# Altium PCB DSP大板子.PcbDoc (part 8 of 9)
Units mil, origin at the board's own origin, x right, y up, seen from the top; angles counter-clockwise.
Board outline 7874.02 x 9055.12 mil, 4 copper layers (Top Layer, GND02, PWR03, Bottom Layer), stack 23.756 mil thick; 656 components, 360 nets, 1967 pads, 2623 vias.
Unrouted connection lines stored in the file: 70.
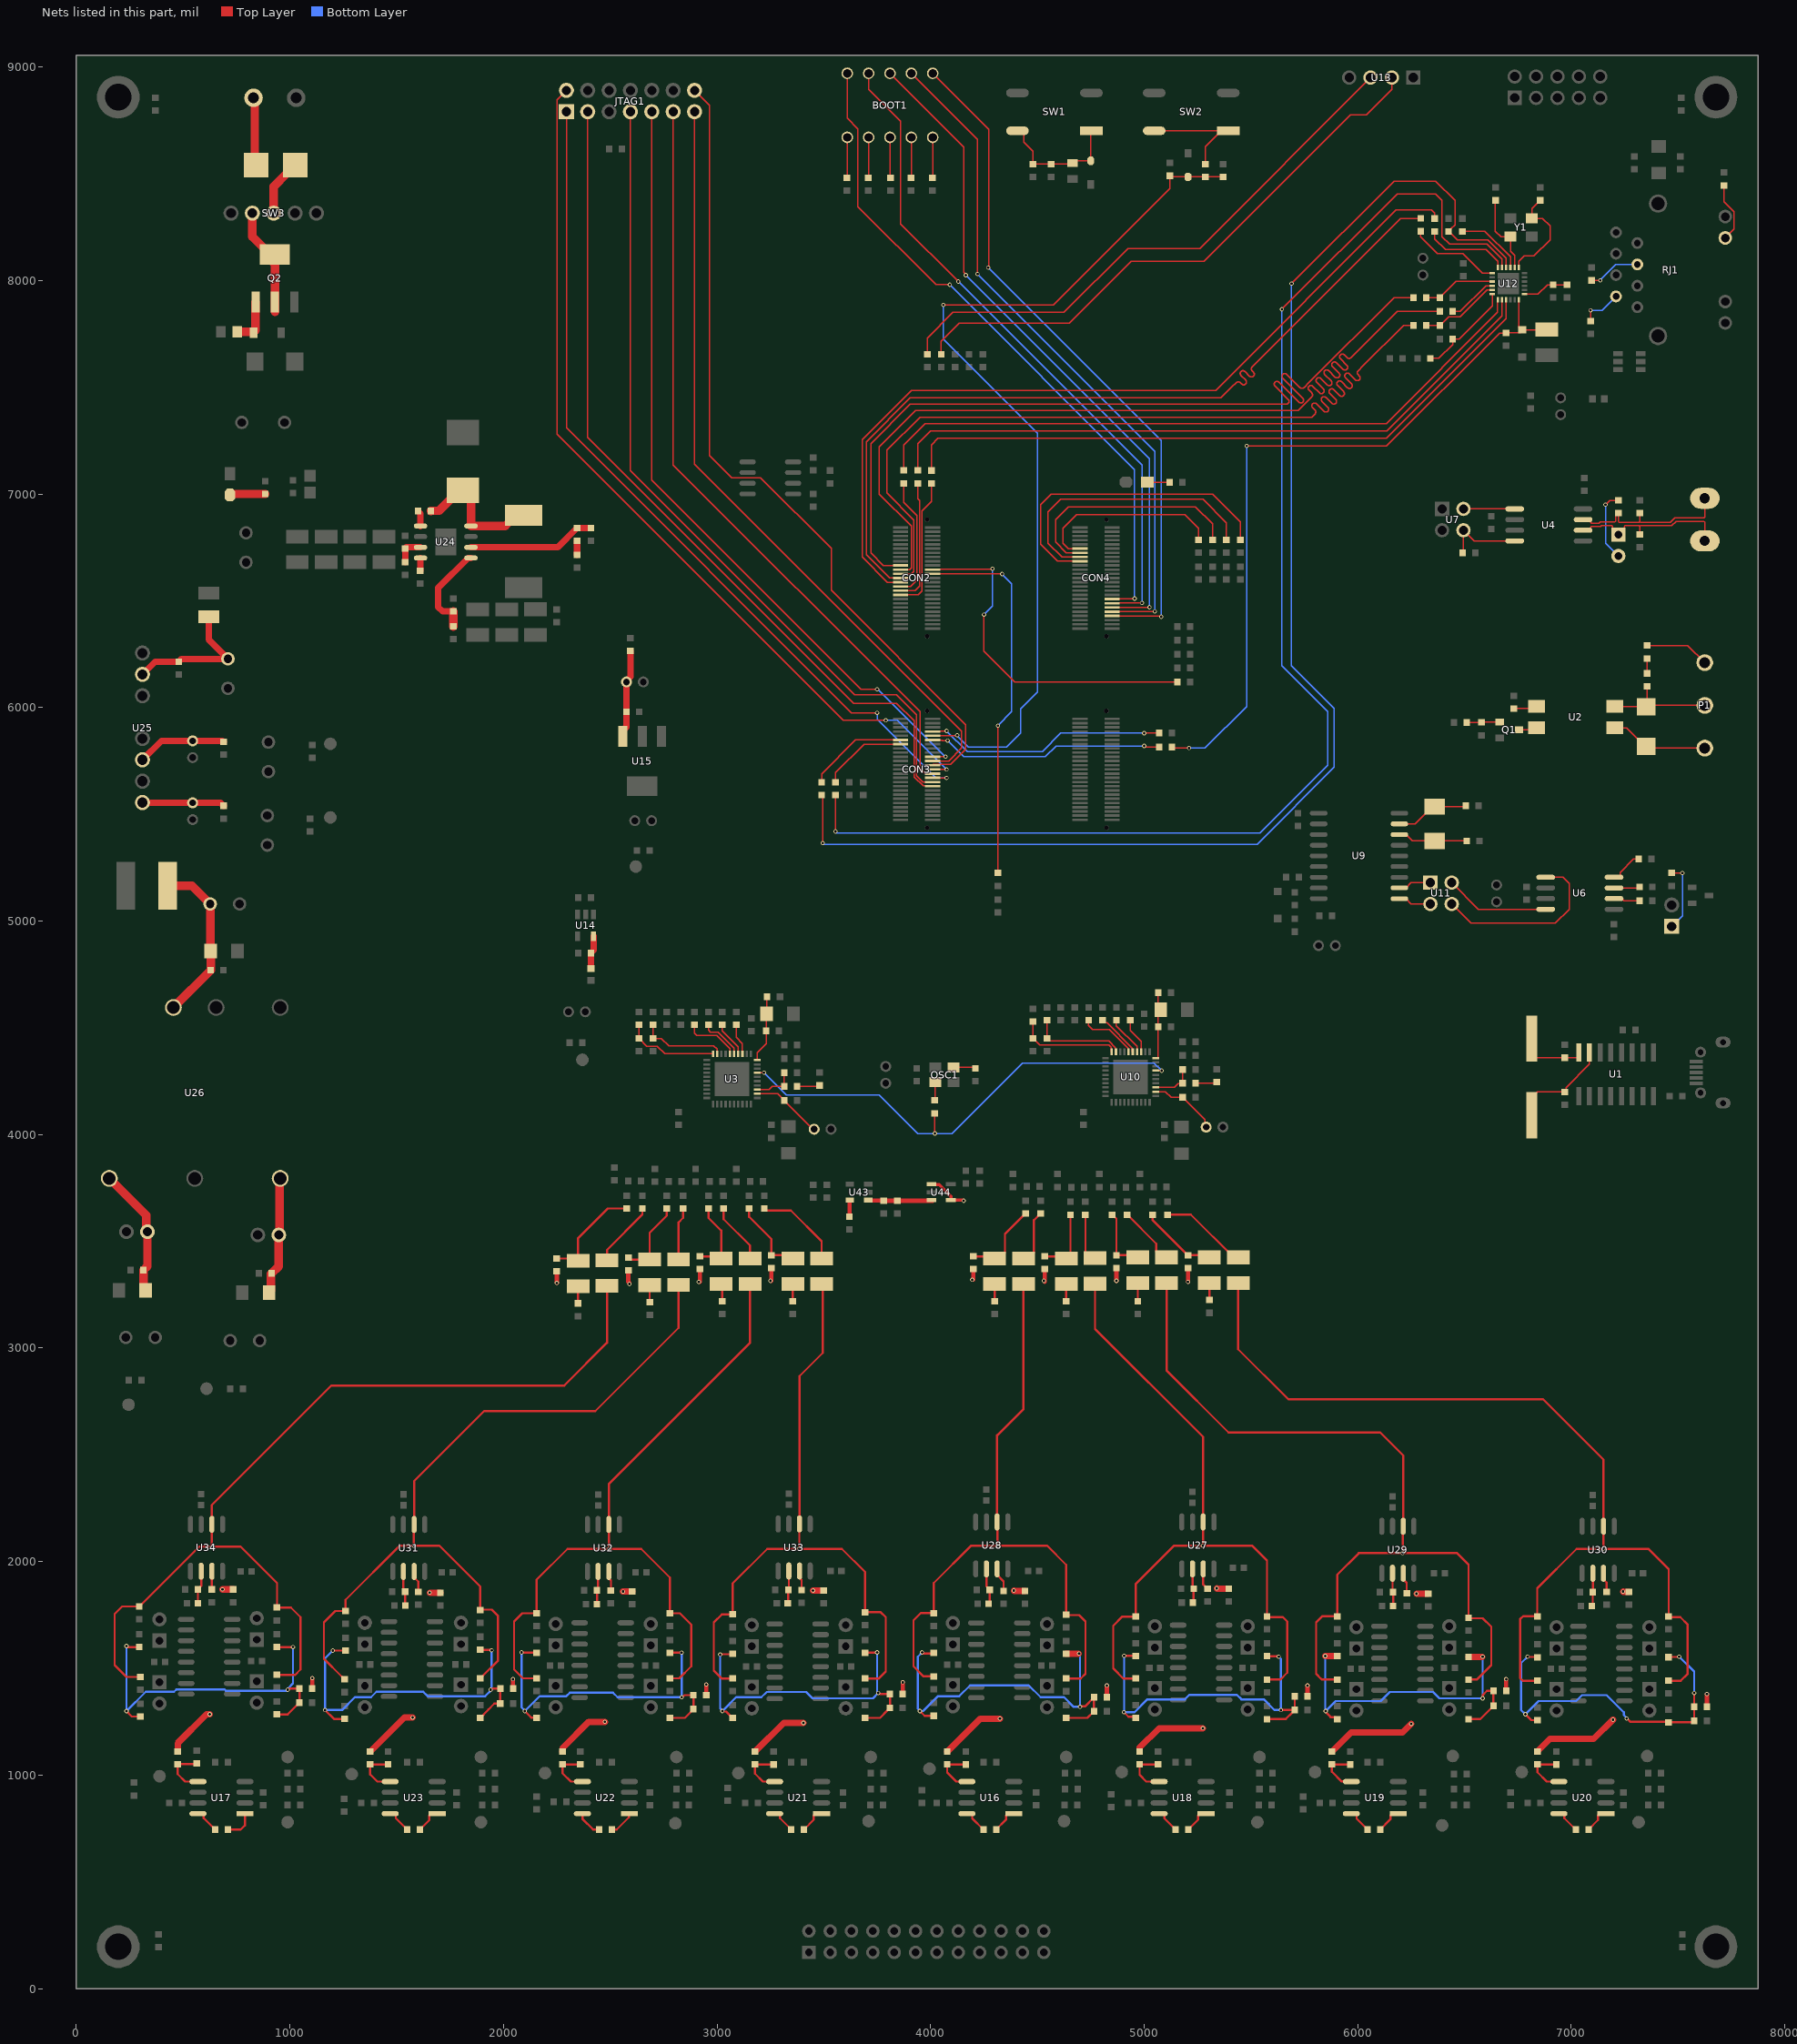
[diagram p7: the nets of this part, all layers, seen from the top]

## Via types
v1: diameter 20, hole 12, Top Layer to Bottom Layer, tented both sides, 2623 vias

## Nets (pads, with @x,y where several pads share a name; then routed paths per layer and width w, separated by ;. In a path a pad name is that pad's centre, name@x,y a point inside that pad or via, vN(x,y) a via of type N, cw(c..) or ccw(c..) an arc to the next point about the centre after c; other vN are vias at no path point) (continued)
J15: CON3.23 JTAG1.11 | length 3622.6
  Top Layer w6: JTAG1.11@2795,8790 2795,7135 3950,5980 3950,5715.66 3972.16,5693.5 4006.54,5693.5 CON3.23@4009.44,5690.6
J16: CON3.29 JTAG1.13 | length 3658.3
  Top Layer w6: JTAG1.13@2895,8790 2895,7140 4145,5890 4145,5810 4084.7,5749.7 CON3.29@4009.44,5749.7
J18: CON3.19 JTAG1.7 | length 3865.6
  Top Layer w6: JTAG1.7@2595,8790 2595,7110 3645,6060 3840,6060 3935,5965 3935,5680 3963.8,5651.2 CON3.19@4009.44,5651.2
K16: CON3.27 JTAG1.14 | length 3876.8
  Top Layer w6: JTAG1.14@2895,8890 2965,8820 2965,7180 3069.31,7075.69 3204.31,7075.69 3535,6745 3535,6550 4165,5920 4165,5805 4092.9,5732.9 4012.34,5732.9 CON3.27@4009.44,5730
K17: CON3.31 JTAG1.9 | length 3697.2
  Top Layer w6: JTAG1.9@2695,8790 2695,7065 3675,6085 v1(3750,6085) ; CON3.31@4009.44,5769.4 4009.74,5769.7 4069.7,5769.7 v1(4070,5770)
  Bottom Layer w6: v1(3750,6085) 3752.5,6085 4067.5,5770 v1(4070,5770)
L16: CON3.21 JTAG1.1 | length 4022.8
  Top Layer w6: JTAG1.1@2295,8790 2295,7310 3630,5975 v1(3750,5975) ; CON3.21@4009.44,5670.9 4009.89,5670.45 4074.55,5670.45 v1(4075,5670)
  Bottom Layer w6: v1(3750,5975) 3750,5945 4025,5670 v1(4075,5670)
L17: CON3.25 JTAG1.2 | length 4169.2
  Top Layer w6: JTAG1.2@2295,8890 2250.57,8845.57 2250.57,7279.43 3590,5940 v1(3790,5940) ; CON3.25@4009.44,5710.3 4009.59,5710.15 4074.85,5710.15 v1(4075,5710)
  Bottom Layer w6: v1(3790,5940) 3845,5940 v1(4075,5710)
M16: CON3.17 JTAG1.3 | length 3969.7
  Top Layer w6: JTAG1.3@2395,8790 2395,7265 3640,6020 3840.42,6020 3923,5937.42 3923,5675.03 3964.99,5633.04 4008.01,5633.04 CON3.17@4009.44,5631.6
MCLK: R27.2 U3.7 U10.7 | length 2285.4
  Top Layer w6: U3.7@3188.1,4289.6 3219.6,4289.6 v1(3220,4290) ; v1(4020,4005) R27.2@4020,4100 ; U10.7@5055.05,4299.6 v1(5082,4299.6)
  Bottom Layer w6: v1(3220,4290) 3325,4185 3760,4185 3940,4005 v1(4020,4005) 4100,4005 4430,4335 5046.6,4335 v1(5082,4299.6)
MDCLK/MDC: R80.1 U12.11 | length 6353.1
  Top Layer w6: v1(3555,5420) R80.1@3555,5590.08 ; v1(5645,7865) 6185,8405 6365,8405 6395,8375 6395,8205 6430,8170 6605,8170 6675,8100 U12.11@6675,8060
  Bottom Layer w6: v1(3555,5420) 3562.15,5412.85 5542.85,5412.85 5860,5730 5860,5980 5645,6195 v1(5645,7865)
MDIO: R84.1 R92.1 U12.10 | length 6645.6
  Top Layer w6: R84.1@3490,5590.08 3495,5585.08 v1(3495,5365) ; v1(5690,7985) 6170,8465 6365,8465 6455,8375 6455,8260 6437.75,8242.75 6437.75,8241.96 R92.1@6425.79,8230 ; R92.1@6425,8230 R92.1@6425.79,8230 ; U12.10@6695,8060 6695,8105 6610,8190 6465.79,8190 R92.1@6425.79,8230
  Bottom Layer w6: v1(3495,5365) 3500,5360 5530,5360 5890,5720 5890,5995 5690,6195 v1@5690,7984.49
NetBOOT1_1: BOOT1.1 R9.1 | length 191.2
  Top Layer w6: R9.1@3607.47,8479.84 3610,8482.37 BOOT1.1@3610,8670
NetBOOT1_2: BOOT1.2 R11.1 | length 191
  Top Layer w6: R11.1@3708.03,8479.84 3710,8481.81 BOOT1.2@3710,8670
NetBOOT1_3: BOOT1.3 R14.1 | length 191
  Top Layer w6: BOOT1.3@3810,8670 3810,8481.84 R14.1@3812,8479.84
NetBOOT1_4: BOOT1.4 R16.1 | length 191
  Top Layer w6: R16.1@3907.9,8479.84 3910,8481.95 BOOT1.4@3910,8670
NetBOOT1_5: BOOT1.5 R17.1 | length 190.5
  Top Layer w6: R17.1@4009.08,8479.84 4010,8480.76 BOOT1.5@4010,8670
NetC1_2: C1.2 R1.1 R5.1 SW1.1 SW1.4 Z1.2 | length 613.7
  Top Layer w6: SW1.4@4406.77,8701 4421.82,8701 4437.24,8685.59 4437.24,8647.31 4480,8604.54 R1.1@4480,8544.92 R5.1@4565,8544.92 4659.92,8544.92 C1.2@4665,8550 4675.12,8560.12 Z1.2@4750,8560.12 4750,8697.77 SW1.1@4753.23,8701
NetC3_1: C3.1 R8.1 R282.2 | length 493.5
  Top Layer w10: R282.2@2250,3420 2250.16,3419.84 2339.86,3419.84 C3.1@2350,3409.7 2350,3515 2488.9,3653.9 R8.1@2576.42,3653.9
NetC3_2: C3.2 R120.2 | length 80.2
  Top Layer w10: R120.2@2350,3209.84 C3.2@2350,3290
NetC6_2: C6.2 R13.1 | length 311.3
  Top Layer w10: C6.2@2485.31,3411.15 2485.31,3460.31 2650.88,3625.88 R13.1@2650.88,3653.9
NetC12_1: C12.1 R25.1 R283.2 | length 381.2
  Top Layer w10: R283.2@2585,3430 2585,3425.63 2595.93,3414.7 C12.1@2685,3414.7 2685,3540 2765,3620 R25.1@2765,3653.9
NetC12_2: C12.2 R123.2 | length 77.2
  Top Layer w10: R123.2@2685,3214.84 2685,3285 C12.2@2690,3290
NetC13_2: C13.2 U1.8 X1.2 | length 315.6
  Top Layer w6: X1.2@6815,4449.25 6815,4382.59 6837.59,4360 C13.2@6970,4360 7026.19,4360 7035,4368.81 U1.8@7035,4384.72
NetC14_2: C14.2 U1.7 X1.1 | length 481.1
  Top Layer w6: X1.1@6815,4090.75 6815,4173.43 6841.5,4199.92 C14.2@6970,4199.92 6975.37,4205.29 6975.37,4220.37 7085,4330 U1.7@7085,4384.72
NetC15_1: C15.1 R29.1 | length 247.9
  Top Layer w10: C15.1@2820,3415 2820,3588.26 2841.67,3609.93 R29.1@2841.67,3653.9
NetC20_1: C20.1 R39.1 R284.2 | length 363.3
  Top Layer w10: R284.2@2919.84,3429.92 3010.08,3429.92 C20.1@3020,3420 ; R39.1@2960,3653.9 2960,3610 3019.84,3550.16 C20.1@3019.84,3419.7
NetC20_2: C20.2 R133.2 | length 72.1
  Top Layer w10: C20.2@3020,3290 3024.84,3285.16 R133.2@3024.84,3219.92
NetC25_1: C25.1 R43.1 | length 285.5
  Top Layer w10: R43.1@3031.15,3653.9 3031.15,3603.85 3155.1,3479.9 C25.1@3155.1,3419.7
NetC28_1: C28.1 C29.1 U3.2 | length 335.6
  Top Layer w6: U3.2@3188.1,4191.1 3284.84,4191.1 C28.1@3315,4160.94 ; C28.1@3315.16,4160 3315.16,4159.21 3449.37,4025 C29.1@3455,4025
NetC30_2: C30.2 C32.2 R53.2 U3.10 | length 315.9
  Top Layer w6: U3.10@3188.1,4348.6 3188.1,4384.31 3230.08,4426.29 C30.2@3230.08,4485 3230.08,4562.78 C32.2@3232.3,4565 3232.3,4642.14 R53.2@3235.16,4645
NetC31_1: C31.1 C34.1 U3.3 | length 201.3
  Top Layer w6: U3.3@3185,4210 3185.8,4210.8 3243.63,4210.8 3257.83,4225 C31.1@3315.08,4225 ; C31.1@3315,4225 3315,4289.92 C34.1@3315.08,4290
NetC31_2: C31.2 R50.1 | length 107.1
  Top Layer w6: C31.2@3375,4225 3474.92,4225 R50.1@3480,4230.08
NetC33_1: C33.1 R48.1 R285.2 | length 378.8
  Top Layer w10: R48.1@3149.86,3653.9 3149.86,3615.14 3255,3510 R285.2@3255,3434.84 3350.16,3434.84 C33.1@3365,3420
NetC33_2: C33.2 R134.2 | length 87.1
  Top Layer w10: C33.2@3350,3305 3355,3300 R134.2@3355,3219.92
NetC36_1: C36.1 U9.8 X2.2 | length 345.2
  Top Layer w6: U9.8@6195,5455 6268.74,5455 6350.16,5536.42 X2.2@6360,5536.42 6501.42,5536.42 C36.1@6505,5540
NetC37_1: C37.1 R52.1 | length 412.3
  Top Layer w10: R52.1@3220,3650 3226.06,3643.94 3346.06,3643.94 3489.61,3500.39 C37.1@3489.61,3419.7
NetC40_1: C40.1 U9.7 X2.1 | length 327.5
  Top Layer w6: U9.7@6195,5405 6225.32,5405 6255.32,5375 X2.1@6360,5375 C40.1@6510.08,5375
NetC41_1: C41.1 R57.1 R286.2 | length 379.6
  Top Layer w10: R286.2@4200,3429.84 4280.16,3429.84 C41.1@4290,3420 ; C41.1@4300,3419.7 4320.95,3419.7 4348.15,3446.9 4348.15,3534.02 4440,3625.87 R57.1@4440,3635
NetC41_2: C41.2 R135.2 | length 79.3
  Top Layer w10: R135.2@4300,3219.84 4300,3285 C41.2@4310,3295
NetC44_1: C44.1 R60.1 | length 263.3
  Top Layer w10: C44.1@4435,3419.7 4455.95,3419.7 4483.15,3446.9 4483.15,3599.02 4519.13,3635 R60.1@4520,3635
NetC47_1: C47.1 R67.1 R287.2 | length 315.6
  Top Layer w10: R287.2@4535,3429.84 4630.16,3429.84 C47.1@4635,3425 ; C47.1@4635,3419.7 4655,3439.7 R67.1@4655,3625
NetC47_2: C47.2 R139.2 | length 70.1
  Top Layer w10: R139.2@4635,3219.92 C47.2@4635,3290
NetC48_1: C48.1 R69.1 | length 232.9
  Top Layer w10: R69.1@4725,3625 4725,3448.33 4752.2,3421.13 C48.1@4770,3421.13
NetC53_1: C53.1 R74.1 R288.2 | length 294
  Top Layer w10: R74.1@4850,3625 4850.87,3625 4870,3605.87 R288.2@4870,3434.84 4964.84,3434.84 C53.1@4965,3435
NetC53_2: C53.2 R140.2 | length 87.3
  Top Layer w10: R140.2@4965,3220 4970,3225 C53.2@4970,3305.2
NetC57_2: C57.2 C58.2 U12.1 | length 218.6
  Top Layer w6: U12.1@6780,7935 6780.79,7935.79 6844.48,7935.79 6888.53,7979.84 C57.2@6915,7979.84 6979.92,7979.84 C58.2@6980,7979.92
NetC59_1: C59.1 R77.1 | length 294.2
  Top Layer w10: R77.1@4920,3630 4920,3625.87 5056.85,3489.02 5056.85,3451.9 5084.05,3424.7 C59.1@5105,3424.7
NetC61_2: C61.2 C65.2 R89.2 U10.10 | length 319
  Top Layer w6: U10.10@5055.05,4358.6 5062.58,4358.6 5065.08,4361.1 C61.2@5065.08,4505 5065.08,4580.08 5070,4585 5065.08,4589.92 R89.2@5065.08,4665
NetC62_1: C62.1 C63.1 U10.2 | length 323.9
  Top Layer w6: U10.2@5055,4200 5056.1,4201.1 5100,4201.1 5126.1,4175 C62.1@5180,4175 ; C62.1@5180.08,4175 5180.08,4174.21 5284.7,4069.59 5284.7,4045.3 C63.1@5295,4035
NetC64_1: C64.1 C66.1 U10.3 | length 197.3
  Top Layer w6: U10.3@5055.8,4220.8 5140.8,4220.8 5159.63,4239.63 5179.71,4239.63 C64.1@5180.08,4240 5180.08,4304.92 C66.1@5180,4305
NetC64_2: C64.2 R87.1 | length 102.1
  Top Layer w6: C64.2@5239.92,4240 5335,4240 R87.1@5340,4245
NetC67_1: C67.1 R91.1 R289.2 | length 363
  Top Layer w10: R91.1@5040,3625 5040,3599.13 5204.21,3434.92 R289.2@5205,3434.92 ; R289.2@5205.08,3434.92 5294.78,3434.92 C67.1@5305,3424.7
NetC67_2: C67.2 R141.2 | length 85.2
  Top Layer w10: R141.2@5305,3220 C67.2@5305,3305.2
NetC70_1: C70.1 R95.1 | length 413
  Top Layer w10: R95.1@5110,3625 5110.08,3625.08 5218.67,3625.08 5419.05,3424.7 C70.1@5440,3424.7
NetC74_1: C74.1 RJ1.5 | length 246.7
  Top Layer w6: C74.1@7095,8000.08 7095.08,8000 v1(7135,8000)
  Bottom Layer w6: v1(7135,8000) 7135,8002.61 7207.39,8075 RJ1.5@7309.09,8075
NetC75_1: C75.1 RJ1.2 | length 196
  Top Layer w6: C75.1@7090,7810 v1(7090,7860)
  Bottom Layer w6: v1(7090,7860) 7144.09,7860 RJ1.2@7209.09,7925
NetC79_2: C79.2 L2.1 U14.5 | length 155.8
  Top Layer w30: C79.2@2409.92,4850 2409.96,4849.96 L2.1@2410,4777.6 L2.1@2410,4777.6 ; C79.2@2409.92,4850.71 2422.4,4863.19 U14.5@2422.4,4928.9
NetC84_1: C84.1 C85.1 R126.2 U15.3 | length 414.2
  Top Layer w30: U15.3@2559.45,5865 2559.45,5892.56 2575.16,5908.27 C85.1@2575.16,5980 ; C85.1@2575.16,5980.71 2576.26,5981.81 C84.1@2576.26,6120 2576.26,6125.73 2595,6144.47 R126.2@2595,6265.16
NetC86_1: C86.1 U24.1 | length 74.9
  Top Layer w30: C86.1@1600.16,6920 1600.16,6919.29 1611.89,6907.56 U24.1@1611.89,6850
NetC86_2: C86.2 D6.1 L3.1 U24.8 | length 640.4
  Top Layer w40: C86.2@1660,6920 1661.51,6921.51 1698.81,6921.51 1795.02,7017.73 1808.46,7017.73 1848.11,6978.08 U24.8@1848.11,6850 2008.31,6850 2057.6,6899.29 L3.1@2095,6899.29
NetC108_2: C108.2 R128.2 U24.6 | length 599.2
  Top Layer w30: U24.6@1848.11,6750 2254.37,6750 2344.29,6839.92 R128.2@2345,6839.92 2409.21,6839.92 2409.29,6839.84 C108.2@2410,6839.84
NetC112_2: C112.2 C118.1 L5.1 U26.6 | length 556.7
  Top Layer w40: L5.1@902.7,3260 911.93,3269.23 911.93,3347.01 C118.1@914.92,3350 948.42,3383.5 C112.2@948.43,3530 ; C112.2@948.43,3530 951.71,3533.29 951.71,3791.71 U26.6@955,3795
NetC117_2: C117.2 R128.1 | length 65.2
  Top Layer w30: C117.2@2345,6714.84 R128.1@2345,6780.08
NetC123_1: C123.1 C155.2 L7.1 U26.4 | length 610.8
  Top Layer w40: U26.4@155,3795 327.89,3622.11 327.89,3550.53 C123.1@333.43,3545 ; L7.1@325,3270 315.77,3279.23 315.77,3364.02 314.84,3364.94 C155.2@314.84,3365 333.42,3383.58 C123.1@333.43,3545
NetC138_1: C138.1 C139.1 L4.2 U25.2 | length 663.8
  Top Layer w30: U25.2@310,6155 369.92,6214.92 C139.1@480,6214.92 ; C139.1@480.71,6214.92 493.59,6227.8 C138.1@710,6227.8 620,6317.8 L4.2@620,6424.88
NetC140_1: C140.1 R195.2 U25.6 | length 418.3
  Top Layer w30: U25.6@310,5755 398.74,5843.74 C140.1@545,5843.74 685.47,5843.74 689.29,5839.92 R195.2@690,5839.92
NetC141_2: C141.2 R200.2 U25.8 | length 386.2
  Top Layer w30: U25.8@310,5555 310.63,5554.37 544.37,5554.37 C141.2@545,5553.74 675.55,5553.74 689.29,5540 R200.2@690,5540
NetC146_1: C146.1 R233.1 U27.2 | length 161.7
  Top Layer w10: U27.2@5226.48,1966.09 5226.48,1878.17 R233.1@5231.42,1873.23 5231.42,1812.63 C146.1@5227.02,1808.23
NetC147_1: C147.1 R234.1 U28.2 | length 171.2
  Top Layer w10: U28.2@4261.62,1966.09 4261.62,1884.26 4276.87,1869.02 R234.1@4276.87,1868.23 4276.87,1808.23 C147.1@4271.87,1803.23
NetC148_1: C148.1 R240.1 U29.2 | length 153.8
  Top Layer w10: U29.2@6162.82,1945.62 6162.82,1859.32 R240.1@6164.22,1857.93 6165.5,1856.65 C148.1@6165.5,1792.93
NetC149_1: C149.1 R241.1 U30.2 | length 154.7
  Top Layer w10: C149.1@7095.61,1793.01 7099.93,1797.33 R241.1@7099.93,1858.01 7100.61,1858.69 U30.2@7100.61,1945.62
NetC150_1: C150.1 R243.1 U31.2 | length 162.7
  Top Layer w10: U31.2@1531.93,1954.07 1531.93,1867.99 R243.1@1539.92,1860 1539.92,1795.68 C150.1@1540.6,1795
NetC151_1: C151.1 R244.1 U32.2 | length 155.6
  Top Layer w10: C151.1@2438.49,1800.54 R244.1@2438.49,1865.54 2443.44,1870.49 U32.2@2443.44,1954.07
NetC152_1: C152.1 R245.1 U33.2 | length 153.6
  Top Layer w10: C152.1@3331.2,1805 3333.41,1807.21 R245.1@3333.41,1868.23 3336.39,1871.21 U33.2@3336.39,1956.41
NetC153_1: C153.1 R247.1 U34.2 | length 155.7
  Top Layer w10: R247.1@569.92,1870.08 569.92,1805.76 C153.1@570.6,1805.08 ; R247.1@569.92,1870.87 585,1885.94 U34.2@585,1955.08
NetC156_1: C156.1 C157.1 C172.2 L6.2 U26.3 | length 792.7
  Top Layer w40: L6.2@428.43,5165 542.2,5165 C156.1@627.2,5080 628.4,5078.8 628.4,4861.2 C172.2@629.6,4860 629.6,4770.48 C157.1@630.08,4770 630,4770 U26.3@455,4595
NetC175_1: C175.1 U43.5 | length 78.5
  Top Layer w20: C175.1@3620,3614.84 3620.85,3615.69 3620.85,3691.76 U43.5@3621.69,3692.6
NetCON2_27: CON2.27 R113.1 | length 1771.7
  Top Layer w6: CON2.27@4009.44,6626.06 4009.97,6625.53 4334.47,6625.53 v1(4335,6625) ; R113.1@4315,5224.84 v1(4315,5915)
  Bottom Layer w6: v1(4315,5915) 4380,5980 4380,6580 v1(4335,6625)
NetCON2_29: CON2.29 R115.1 | length 1649
  Top Layer w6: CON2.29@4009.44,6645.76 4011.56,6647.88 4287.88,6647.88 v1(4290,6650) ; v1(4250,6435) 4250,6265 4395,6120 R115.1@5155.08,6120
  Bottom Layer w6: v1(4250,6435) 4290,6475 v1(4290,6650)
NetCON3_38: CON3.38 R80.2 | length 405.2
  Top Layer w6: R80.2@3555,5649.92 3555,5695 3688.4,5828.4 CON3.38@3859.84,5828.4
NetCON3_40: CON3.40 R84.2 | length 475.4
  Top Layer w6: R84.2@3490,5649.92 3490,5690 3648.1,5848.1 CON3.40@3859.84,5848.1
NetCON5_1: CON5.1 J1.1 R34.1 U4.6 | length 769.5
  Top Layer w6: U4.6@7055,6830 7082.13,6830 7090.44,6838.31 7090.44,6842.72 7094.73,6847 7136.51,6847 7141.74,6852.23 7189.3,6852.23 7192.82,6848.72 7192.82,6837.18 J1.1@7220,6810 7247.41,6837.41 7247.41,6848.49 7250.93,6852 7277.94,6852 7277.98,6852.04 7316.41,6852.04 7319.92,6848.52 7319.92,6810.08 R34.1@7320,6810 ; 7320,6848.52 7323.51,6852.04 7470.52,6852.04 7490.48,6872 7621.49,6872 7625,6868.49 CON5.1@7625,6780
NetCON5_2: CON5.2 R42.2 R55.1 U4.7 | length 794
  Top Layer w6: U4.7@7055,6880 7082.13,6880 7090.44,6871.69 7090.44,6867.28 7094.73,6863 7129.88,6863 7135.11,6868.23 7203.74,6868.23 7207.25,6871.75 7207.25,6898.04 7219.21,6910 R42.2@7220,6910 7220,6871.51 7223.51,6868 7271.31,6868 7271.35,6868.04 7316.41,6868.04 7319.92,6871.55 7319.92,6910 R55.1@7320,6910.08 ; 7320,6871.55 7323.51,6868.04 7463.89,6868.04 7483.85,6888 7621.49,6888 7625,6891.51 CON5.2@7625,6980
NetD7_2: D7.2 Q2.1 R274.2 | length 225.9
  Top Layer w40: R274.2@753.04,7760 827.56,7760 D7.2@830.63,7756.93 ; D7.2@830.63,7755 D7.2@830.63,7756.93 ; Q2.1@839.45,7898.39 839.45,7765.75 D7.2@830.63,7756.93
NetF1_1: F1.1 P2.2 | length 319.8
  Top Layer w40: P2.2@830,8855 835.77,8849.23 835.77,8545.77 F1.1@841.54,8540
NetF1_2: F1.2 SW3.2 | length 266.5
  Top Layer w40: SW3.2@925,8315 925,8440 987.72,8502.72 987.72,8502.81 1024.91,8540 F1.2@1025,8540
NetJ1_2: J1.2 R42.1 | length 333.1
  Top Layer w6: v1(7160,6950) 7179.84,6969.84 R42.1@7220,6969.84
  Bottom Layer w6: v1(7160,6950) 7160,6770 J1.2@7220,6710
NetLED1_1: LED1.1 R32.2 | length 105
  Top Layer w6: LED1.1@5015,7055 R32.2@5120,7055
NetLED2_2: LED2.2 R273.2 | length 167.1
  Top Layer w40: LED2.2@720,6995 725,7000 R273.2@885,7000
NetOSC1_1: OSC1.1 R18.1 | length 103.6
  Top Layer w6: OSC1.1@4108.3,4314.5 4205.42,4314.5 R18.1@4210,4309.92
NetOSC1_3: OSC1.3 R27.1 | length 86.5
  Top Layer w6: R27.1@4020,4159.84 4021.7,4161.54 OSC1.3@4021.7,4245.6
NetQ1_1: Q1.1 R7.2 R12.2 | length 155.8
  Top Layer w6: R7.2@6510,5930 6579.84,5930 R12.2@6580,5929.84 6582.56,5932.4 Q1.1@6664.73,5932.4
NetQ1_3: Q1.3 U2.2 | length 85.8
  Top Layer w6: Q1.3@6755.27,5895 6826.93,5895 U2.2@6836.93,5905
NetQ2_2: Q2.2 Q2.4 SW3.3 | length 512.4
  Top Layer w40: SW3.3@825,8315 825,8204.37 907.76,8121.61 Q2.4@930,8121.61 ; Q2.4@902.23,8104.38 930,8076.61 Q2.2@930,7898.39 Q2.2@930,7853.39
NetR2_2: R2.2 R4.1 | length 70.2
  Top Layer w6: R4.1@7355,6159.84 R2.2@7355,6230
NetR3_2: R3.2 U2.1 | length 111.1
  Top Layer w6: R3.2@6730,5995 6826.93,5995 U2.1@6836.93,6005
NetR15_1: R15.1 SW2.1 SW2.4 | length 566.8
  Top Layer w6: SW2.4@5047.06,8701 SW2.1@5393.51,8701 5360.05,8701 5285.77,8626.72 R15.1@5285.77,8544.92
NetR19_2: R19.2 R36.1 U3.20 | length 440.6
  Top Layer w6: R36.1@2635,4449.84 R19.2@2635,4515.16 ; R36.1@2635.79,4449.84 2671.59,4414.04 2719.48,4414.04 2755.32,4378.2 U3.20@2981.4,4378.2
NetR20_2: R20.2 R37.2 U3.19 | length 408.1
  Top Layer w6: R20.2@2700,4515.08 R37.2@2700,4449.92 2740.08,4449.92 2775,4415 2985,4415 3000.56,4399.44 3000.56,4378.74 U3.19@3001.1,4378.2
NetR24_1: R24.1 U3.16 | length 259.7
  Top Layer w6: R24.1@2895,4515 2895,4475 2905,4465 2998.05,4465 3060.1,4402.95 U3.16@3060.1,4378.2
NetR26_1: R26.1 U3.15 | length 206.9
  Top Layer w6: R26.1@2960,4515 2960,4490 2970,4480 3005,4480 3079.8,4405.2 U3.15@3079.8,4378.2
NetR28_1: R28.1 U3.14 | length 167.7
  Top Layer w6: R28.1@3025,4515 3025,4485 3099.5,4410.5 U3.14@3099.5,4378.2
NetR31_1: R31.1 U3.13 | length 148.9
  Top Layer w6: R31.1@3090,4515 3090,4455 3119.2,4425.8 U3.13@3119.2,4378.2
NetR44_1: R44.1 U6.8 | length 158.8
  Top Layer w6: U6.8@7200,5205 7220.69,5205 7229,5213.31 7229,5227.88 7291.12,5290 R44.1@7315.08,5290
NetR45_2: R45.2 U6.7 | length 122.2
  Top Layer w6: U6.7@7200,5155 7315.16,5155 R45.2@7320.16,5160
NetR49_1: R49.1 U8.1 | length 320.3
  Top Layer w6: R49.1@7470,5224.84 v1(7519.84,5224.84)
  Bottom Layer w6: U8.1@7470,4975 7519.84,5024.84 v1(7519.84,5224.84)
NetR54_2: R54.2 U6.6 | length 124.2
  Top Layer w6: U6.6@7200,5105 7236.87,5105 7246.87,5095 R54.2@7320.08,5095
NetR58_2: R58.2 R70.1 U10.20 | length 484.1
  Top Layer w6: R70.1@4480,4449.84 R58.2@4480,4530 ; R70.1@4480.79,4449.84 4510.63,4420 4835,4420 4846.59,4408.41 4846.59,4389.96 U10.20@4848.35,4388.2
NetR59_2: R59.2 R71.2 U10.19 | length 436
  Top Layer w6: R71.2@4545,4450 4557.04,4437.96 4834.01,4437.96 4865.55,4406.42 4865.55,4390.7 U10.19@4868.05,4388.2 ; R71.2@4545,4461.88 R59.2@4545,4540
NetR63_1: R63.1 U10.16 | length 270.3
  Top Layer w6: R63.1@4740,4535.08 4740,4511.12 4759.06,4492.06 4837.57,4492.06 4924.55,4405.08 4924.55,4390.7 U10.16@4927.05,4388.2
NetR64_1: R64.1 U10.15 | length 208.9
  Top Layer w6: R64.1@4805,4530 4811.88,4523.12 4826.11,4523.12 4944.25,4404.98 4944.25,4390.7 U10.15@4946.75,4388.2
NetR66_1: R66.1 U10.14 | length 191.8
  Top Layer w6: R66.1@4870,4540 4870,4509.01 4966.06,4412.95 4966.06,4388.59 U10.14@4966.45,4388.2
NetR68_1: R68.1 U10.13 | length 168
  Top Layer w6: R68.1@4935,4535 4935,4487.61 4986.15,4436.46 U10.13@4986.15,4388.2
NetR76_1: R76.1 RJ1.10 | length 282.5
  Top Layer w6: R76.1@7715,8445.16 7715,8367.77 7761.79,8320.97 7761.79,8239.91 RJ1.10@7720.91,8199.01
NetR81_1: R81.1 R298.1 U12.18 | length 462
  Top Layer w6: R298.1@6340,7635 6380,7635 6444.84,7699.84 R81.1@6444.84,7725 6475,7725 6629.9,7879.9 U12.18@6629.9,7935.79
NetR88_1: R88.1 U12.9 | length 324.5
  Top Layer w6: R88.1@6490,8230 6595,8230 6714.84,8110.16 U12.9@6714.84,8060.16
NetR90_1: R90.1 R102.2 U12.17 | length 378.9
  Top Layer w6: R90.1@6320,7790 R102.2@6385,7790 6385,7790.79 6396.96,7802.75 6397.75,7802.75 6425.25,7830.25 6480.25,7830.25 6605.47,7955.47 U12.17@6629.9,7955.47
NetR93_1: R93.1 U12.16 | length 239.9
  Top Layer w6: R93.1@6444.92,7855 6479.52,7855 6599.68,7975.16 6634.84,7975.16 U12.16@6635,7975
NetR94_1: R94.1 R103.2 U12.15 | length 340.7
  Top Layer w6: R94.1@6320,7920 R103.2@6385.08,7920 ; R103.2@6385,7920.71 6459.13,7994.84 U12.15@6629.9,7994.84
NetR97_2: R97.2 U12.12 | length 403.7
  Top Layer w6: R97.2@6360,8230 6360,8195 6410.89,8144.11 6600.89,8144.11 6655.79,8089.21 U12.12@6655.79,8060.1
NetR98_1: R98.1 U12.13 | length 430.8
  Top Layer w6: R98.1@6295,8230.16 6295,8205 6373.8,8126.2 6492.15,8126.2 6584.15,8034.21 U12.13@6629.9,8034.21
NetR127_1: R127.1 R146.2 U24.3 | length 138.5
  Top Layer w30: R146.2@1540,6679.84 R127.1@1540,6745.08 ; R127.1@1540.71,6745.08 1545.63,6750 U24.3@1611.89,6750
NetR131_1: R131.1 R150.2 U24.5 | length 449.6
  Top Layer w30: R131.1@1765,6450 1715,6450 1695,6470 1695,6560.2 1834.8,6700 U24.5@1848.11,6700
  Top Layer w40: R150.2@1765,6379.92 R131.1@1765,6450
NetR132_2: R132.2 U24.4 | length 61.3
  Top Layer w30: R132.2@1610,6639.92 1610.71,6639.92 1611.89,6641.1 U24.4@1611.89,6700
NetR145_2: R145.2 R149.2 U16.5 | length 234.8
  Top Layer w10: R145.2@4165,1050 4164.92,1050.08 4077.94,1050.08 R149.2@4077.86,1050.16 4077.86,1012.14 4120,970 U16.5@4170,970
NetR151_2: R151.2 R235.2 U17.5 | length 246.7
  Top Layer w10: R235.2@565,1055 562.58,1052.58 477.42,1052.58 R151.2@475,1050.16 475,1005 510,970 U17.5@570,970
NetR154_2: R154.2 R229.2 U18.5 | length 246.7
  Top Layer w10: U18.5@5070,970 5010,970 4978.57,1001.43 R154.2@4978.57,1050.16 4978.61,1050.12 5064.88,1050.12 R229.2@5070,1045
NetR156_2: R156.2 R232.2 U19.5 | length 229.9
  Top Layer w10: R232.2@5965,1050 5964.92,1050.08 5879.36,1050.08 R156.2@5879.29,1050.16 5879.29,1015.71 5924.41,970.59 5969.41,970.59 U19.5@5970,970
NetR159_2: R159.2 R237.2 U22.5 | length 234.2
  Top Layer w10: R237.2@2360,1050 2359.88,1050.12 2276.47,1050.12 R159.2@2276.43,1050.16 2276.43,1009.58 2315.66,970.35 2369.65,970.35 U22.5@2370,970
NetR161_2: R161.2 R236.2 U20.5 | length 244.6
  Top Layer w10: R161.2@6840.6,1050.16 6840.68,1050.08 6929.92,1050.08 R236.2@6930,1050 ; R161.2@6841.39,1050.16 6841.39,1013.61 6885,970 U20.5@6941.91,970
NetR162_2: R162.2 R238.2 U21.5 | length 238.4
  Top Layer w10: R162.2@3177.14,1050.16 3177.22,1050.08 3264.92,1050.08 R238.2@3265,1050 ; R162.2@3177.93,1050.16 3177.93,1007.07 3215,970 U21.5@3270,970
NetR164_2: R164.2 R239.2 U23.5 | length 233.4
  Top Layer w10: R164.2@1375.71,1050.16 1375.75,1050.12 1454.88,1050.12 R239.2@1455,1050 ; R164.2@1376.5,1050.16 1376.5,1003.5 1410,970 U23.5@1470,970
NetR165_1: R165.1 R181.1 R198.1 R215.1 R242.2 R290.1 | length 1776.4
  Top Layer w10: v1(4905,1295) 4926.61,1273.39 4951.61,1273.39 R165.1@4960,1265 ; v1@4905,1560 v1@4907.07,1557.93 ; v1@4906.55,1558.45 4959.55,1558.45 R181.1@4960.07,1557.93 ; R215.1@5570,1555 5571.51,1556.51 5628.49,1556.51 v1(5630,1555) ; R198.1@5575,1260 5577.85,1262.85 5662.93,1262.85 5694.33,1294.25 5695.12,1294.25 5705.08,1304.21 R242.2@5705.08,1305 5705.08,1369.92 R290.1@5705,1370 ; v1(5640,1305) R242.2@5705,1305
  Bottom Layer w10: v1(4906.03,1558.97) 4906.03,1296.03 v1(4905,1295) 4955,1295 5015,1355 5190.3,1355 5211.3,1376 5434.43,1376 5455.43,1355 5560,1355 5610,1305 v1(5640,1305) ; v1(5630,1555) 5630,1554.14 5640,1544.14 v1@5640,1309.62
NetR167_1: R167.1 R183.1 R201.1 R217.1 R246.2 R291.1 | length 1859.8
  Top Layer w10: v1(3950,1300) 3972.07,1277.93 R167.1@4014.76,1277.93 ; v1@3960,1570 4011.83,1570 R183.1@4014.76,1572.93 ; R201.1@4634.76,1268.01 4733.88,1268.01 4765,1299.13 R246.2@4765,1300 ; v1(4700,1320) 4701.91,1321.91 4722.78,1321.91 4765.08,1364.21 R291.1@4765.08,1365 ; R246.2@4765.08,1300 R291.1@4765.08,1364.92
  Top Layer w30: R217.1@4634.76,1567.85 v1@4692.85,1567.85
  Bottom Layer w10: v1(3960,1575) 3940,1555 3940,1310.86 3950,1300.86 v1(3950,1300) 3950.18,1300.18 3965.18,1300.18 4035,1370 4134.39,1370 4185.39,1421 4459.13,1421 4515.13,1365 4625,1365 4670,1320 v1(4700,1320) ; v1(4695,1570) 4695,1567.29 4700,1562.29 v1@4700,1322.71
NetR169_1: R169.1 R185.1 R203.1 R219.1 R248.2 R292.1 | length 1714.6
  Top Layer w10: v1@5845,1300 5872.78,1272.22 5894.16,1272.22 R169.1@5903.53,1262.85 ; R203.1@6518.53,1262.85 6573.72,1262.85 6635,1324.13 R248.2@6635,1325 ; v1(6585,1360) 6585.18,1360.18 6585.18,1375.18 6605,1395 R292.1@6635.16,1395 ; R248.2@6635.08,1325 R248.2@6635.08,1325 R292.1@6635.12,1394.88
  Top Layer w30: v1(5847.85,1557.85) R185.1@5903.53,1557.85 ; R219.1@6518.53,1552.77 v1@6582.77,1552.77
  Bottom Layer w10: v1@5847.85,1302.85 v1(5847.85,1557.85) ; v1(5850,1300) 5897.16,1347.16 6107.16,1347.16 6150,1390 6352.5,1390 6382.5,1360 v1(6585,1360) v1(6585,1555)
NetR171_1: R171.1 R187.1 R205.1 R221.1 R250.2 R293.2 | length 1677.4
  Top Layer w10: v1(6785,1285) 6812.23,1257.77 R171.1@6840.6,1257.77 ; v1(6795,1555) 6796.19,1553.81 6839.41,1553.81 R187.1@6840.6,1552.62 ; v1(7259,1265) 7261.71,1265 7277.05,1249.66 7453.64,1249.66 R205.1@7455.6,1247.7 7572.7,1247.7 R250.2@7577.54,1252.54 ; R221.1@7455.6,1552.7 7456.75,1553.85 7503.85,1553.85 v1(7505,1555) ; v1(7575,1385) v1(7575,1385) 7575.04,1320.04 R293.2@7575.08,1320 ; R250.2@7575.08,1255 R293.2@7575.08,1319.92
  Bottom Layer w10: v1(6795,1555) 6765,1525 6765,1305 v1(6785,1285) 6847.08,1347.08 7022.08,1347.08 7050,1375 7165,1375 7245.79,1294.21 7245.79,1280.92 7259,1267.71 v1(7259,1265) ; v1(7505,1555) 7575,1485 v1(7575,1385)
NetR173_1: R173.1 R189.1 R207.1 R223.1 R251.2 R294.1 | length 1786.7
  Top Layer w10: v1(1165,1305) 1206.29,1263.71 R173.1@1256.23,1263.71 ; v1(1201.29,1583.71) R189.1@1261.23,1583.71 ; R223.1@1890,1590 1893.14,1586.86 1943.14,1586.86 v1(1945,1585) ; R207.1@1891.23,1268.79 1892.01,1268.79 1929.71,1306.48 1929.71,1307.27 1957.44,1335 R251.2@1990,1335 ; v1(1940,1400) 1942.71,1400 1947.71,1405 R294.1@1985.16,1405 ; R251.2@1985.08,1335 R251.2@1985.08,1335 R294.1@1985.12,1404.88
  Bottom Layer w10: v1(1201.29,1583.71) 1165,1547.42 v1(1165,1305) 1245,1305 1305,1365 1380.08,1365 1406.08,1391 1624.62,1391 1645.62,1370 1915,1370 v1@1945,1400 ; v1(1940,1400) 1940,1402.71 1945,1407.71 v1(1945,1585)
NetR175_1: R175.1 R191.1 R209.1 R225.1 R253.2 R295.1 | length 1719.5
  Top Layer w10: v1(2085,1575) 2085.66,1574.34 2150.66,1574.34 R191.1@2155,1570 ; v1(2100,1300) 2130.06,1269.94 2153.62,1269.94 R175.1@2154.95,1268.61 ; R209.1@2779.95,1268.61 2849.47,1268.61 2890.87,1310 R253.2@2895,1310 ; R225.1@2779.95,1573.68 2780.28,1574.01 2829.72,1574.01 2830,1574.29 v1@2830,1575 ; v1@2833.68,1573.68 v1(2834.34,1574.34) ; v1(2835,1365) 2837.71,1365 2847.71,1375 R295.1@2890.08,1375 R253.2@2890.08,1310.08
  Bottom Layer w10: v1(2085,1575) 2085,1317.71 2100,1302.71 v1(2100,1300) 2170,1370 2295.2,1370 2311.2,1386 2513.62,1386 2534.62,1365 v1@2836.07,1365 ; v1(2834.34,1574.34) 2834.67,1574.01 2834.67,1365.33 v1(2835,1365)
NetR177_1: R177.1 R193.1 R211.1 R227.1 R254.2 R296.1 | length 1697.8
  Top Layer w10: v1(3015,1565) 3016.59,1566.59 3071.32,1566.59 R193.1@3072.9,1568.17 ; v1(3025,1300) 3026.91,1298.09 3042.2,1298.09 3072.11,1268.17 R177.1@3072.9,1268.17 ; R211.1@3690,1265 3693.17,1268.17 3763.25,1268.17 3799.33,1304.25 3800.12,1304.25 3810.08,1314.21 R254.2@3810.08,1315 ; R227.1@3692.9,1573.25 v1@3753.25,1573.25 ; v1@3748.25,1573.25 v1(3750,1575) ; v1(3755,1385) 3757.71,1385 3762.71,1380 R296.1@3810.16,1380 3810.12,1379.96 R254.2@3810.12,1315.12
  Bottom Layer w10: v1(3015,1565) 3015,1312.71 3025,1302.71 v1(3025,1300) 3090,1365 3207.85,1365 3232.85,1390 3417.76,1390 3447.76,1360 3730,1360 v1(3755,1385) 3755,1387.71 3750,1392.71 v1(3750,1575)
NetR179_1: R179.1 R196.1 R213.1 R230.1 R255.2 R297.1 | length 1779.1
  Top Layer w10: v1(235,1300) 260,1275 R179.1@300,1275 ; v1@235.16,1600.16 R196.1@295,1600.16 ; R213.1@935,1285 990.16,1285 1034.41,1329.25 1035.2,1329.25 1045.16,1339.21 R255.2@1045.16,1340 1045.12,1340.04 R297.1@1045.12,1404.88 ; R230.1@940,1595 945.08,1600.08 v1(1014.92,1600.08) ; v1(990,1400) 992.71,1400 997.71,1405 R297.1@1045.08,1405
  Bottom Layer w10: v1(235,1605) v1(235,1300) 325.54,1390.54 458.24,1390.54 468.7,1401 694.91,1401 700.37,1395.54 985.54,1395.54 v1(990,1400) ; v1@990,1405 1014.92,1429.92 1014.92,1599.92 1015,1600 v1(1014.92,1600.08)
NetR249_2: R249.2 U27.3 | length 101.6
  Top Layer w10: U27.3@5276.48,1966.09 5276.48,1893.09 5283.67,1885.9 5283.67,1885.12 5295.63,1873.15 R249.2@5296.42,1873.15
NetR252_2: R252.2 U28.3 | length 115.5
  Top Layer w10: U28.3@4311.62,1966.09 4311.62,1938.09 4341.87,1907.84 R252.2@4341.87,1863.15
NetR256_2: R256.2 U29.3 | length 99.6
  Top Layer w10: U29.3@6212.82,1945.62 6212.82,1917.62 6229.3,1901.15 R256.2@6229.3,1852.85
NetR259_2: R259.2 U30.3 | length 93.7
  Top Layer w10: U30.3@7150.61,1945.62 7150.61,1916.73 7165.01,1902.33 R259.2@7165.01,1857.93
NetR260_2: R260.2 U31.3 | length 103.4
  Top Layer w10: U31.3@1581.93,1954.07 1581.93,1926.07 1601.93,1906.07 R260.2@1601.93,1858.91
NetR261_2: R261.2 U32.3 | length 94.2
  Top Layer w10: U32.3@2493.44,1954.07 2493.44,1921.2 2503.44,1911.2 R261.2@2503.44,1863.99
NetR262_2: R262.2 U33.3 | length 94.2
  Top Layer w10: U33.3@3386.39,1956.41 3386.39,1923.54 3396.39,1913.54 R262.2@3396.39,1866.33
NetR264_2: R264.2 U34.3 | length 85.1
  Top Layer w10: R264.2@635,1870 U34.3@635,1955.08
NetRg1_1: Rg1.1 U16.1 | length 125.7
  Top Layer w10: Rg1.1@4307.1,745 4307.1,745.79 4353,791.69 4353,811 4362,820 U16.1@4390,820
NetRg1_2: Rg1.2 U16.8 | length 116.8
  Top Layer w10: U16.8@4170,820 4186.69,820 4195,811.69 4195,798.04 4247.25,745.79 Rg1.2@4247.25,745
NetRg2_1: Rg2.1 U17.1 | length 143.3
  Top Layer w10: Rg2.1@710,745 770,745 790,765 U17.1@790,820
NetRg2_2: Rg2.2 U17.8 | length 119.1
  Top Layer w10: U17.8@570,820 588.63,820 596.94,811.69 596.94,799 650.16,745.79 Rg2.2@650.16,745
NetRg3_1: Rg3.1 U18.1 | length 126
  Top Layer w10: Rg3.1@5206.37,745 5206.37,745.79 5253,792.42 5253,811 5262,820 U18.1@5290,820
NetRg3_2: Rg3.2 U18.8 | length 116.5
  Top Layer w10: U18.8@5070,820 5086.69,820 5095,811.69 5095,797.32 5146.53,745.79 Rg3.2@5146.53,745
NetRg4_1: Rg4.1 U19.1 | length 126.3
  Top Layer w10: Rg4.1@6105.65,745 6105.65,745.79 6153,793.14 6153,811 6162,820 U19.1@6190,820
NetRg4_2: Rg4.2 U19.8 | length 116.2
  Top Layer w10: U19.8@5970,820 5986.69,820 5995,811.69 5995,796.59 6045.8,745.79 Rg4.2@6045.8,745
NetRg5_1: Rg5.1 U20.1 | length 125.1
  Top Layer w10: Rg5.1@7080.53,745 7080.53,745.79 7124.91,790.17 7124.91,811 7133.91,820 U20.1@7161.91,820
NetRg5_2: Rg5.2 U20.8 | length 117.7
  Top Layer w10: U20.8@6941.91,820 6959.16,820 6967.48,811.69 6967.48,799 7020.69,745.79 Rg5.2@7020.69,745
NetRg6_1: Rg6.1 U22.1 | length 121.3
  Top Layer w10: Rg6.1@2508.55,745 2530,745 2587.51,802.51 2587.51,817.51 U22.1@2590,820
NetRg6_2: Rg6.2 U22.8 | length 124.4
  Top Layer w10: U22.8@2370,820 2370,795 2420,745 Rg6.2@2448.71,745
NetRg7_1: Rg7.1 U21.1 | length 125.4
  Top Layer w10: Rg7.1@3407.82,745 3407.82,745.79 3453,790.96 3453,811 3462,820 U21.1@3490,820
NetRg7_2: Rg7.2 U21.8 | length 117.1
  Top Layer w10: U21.8@3270,820 3286.69,820 3295,811.69 3295,798.77 3347.98,745.79 Rg7.2@3347.98,745
NetRg8_1: Rg8.1 U23.1 | length 124.8
  Top Layer w10: Rg8.1@1609.27,745 1609.27,745.79 1653,789.51 1653,811 1662,820 U23.1@1690,820
NetRg8_2: Rg8.2 U23.8 | length 118.4
  Top Layer w10: U23.8@1470,820 1487.9,820 1496.22,811.69 1496.22,799 1549.43,745.79 Rg8.2@1549.43,745
OUT1_P: C6.1 R180.2 R197.2 R214.2 R231.2 U34.6 | length 4577.6
  Top Layer w10: R180.2@300,1459.92 235.08,1459.92 180,1515 180,1755 214.92,1789.92 R197.2@295,1789.92 295.79,1789.92 575.87,2070 v1(635,2070) ; R214.2@940,1469.92 1024.92,1469.92 1050,1495 1050,1740 1005.08,1784.92 R231.2@940,1784.92 940,1900 770,2070 v1(635,2070) ; C6.1@2485,3290 2485,3025 2285,2825 1195,2825 635,2265 U34.6@635,2175.08 v1(635,2070)
OUT2_P: C15.2 R174.2 R190.2 R208.2 R224.2 U31.6 | length 3874
  Top Layer w10: R174.2@1256.23,1448.48 1255.44,1448.48 1243.48,1460.44 1243.48,1461.22 1160,1544.7 1160,1715 1213.55,1768.55 R190.2@1261.23,1768.55 1261.23,1821.23 1515,2075 v1(1580,2075) ; R208.2@1891.23,1453.55 1892.01,1453.55 1903.97,1465.51 1903.97,1466.3 1975,1537.33 1975,1745 1945,1775 1892.59,1775 R224.2@1891.23,1773.63 1891.23,1883.77 1700,2075 v1(1580,2075) ; C15.2@2820,3300 2820,3095 2430,2705 1910,2705 1581.93,2376.93 U31.6@1581.93,2174.07 1580.96,2173.1 1580.96,2075.96 v1(1580,2075)
OUT3_P: C25.2 R176.2 R192.2 R210.2 R226.2 U32.6 | length 3477.4
  Top Layer w10: R176.2@2154.95,1453.37 2091.63,1453.37 2050,1495 2050,1720 2088.45,1758.45 R192.2@2154.95,1758.45 2154.95,1914.95 2300,2060 v1(2495,2060) ; R210.2@2779.95,1453.53 2823.53,1453.53 2880,1510 2880,1705 2826.47,1758.53 R226.2@2779.95,1758.53 2779.95,1925.05 2645,2060 v1(2495,2060) ; C25.2@3155,3290 3155,3025 2493.44,2363.44 U32.6@2493.44,2174.07 2494.22,2173.28 2494.22,2060.78 v1(2495,2060)
OUT4_P: C37.2 R178.2 R194.2 R212.2 R228.2 U33.6 | length 3250
  Top Layer w10: R178.2@3072.9,1453.09 3021.91,1453.09 2985,1490 2985,1715 3023.09,1753.09 R194.2@3072.9,1753.09 3072.9,1897.9 3235,2060 v1(3385,2060) ; C37.2@3495,3295 3495,2977.22 3386.39,2868.61 U33.6@3386.39,2176.41 3385.7,2175.71 3385.7,2060.7 v1(3385,2060) ; R212.2@3692.9,1453.17 3758.17,1453.17 3790,1485 3790,1740 3766.91,1763.09 R228.2@3692.9,1763.09 3692.9,1952.1 3585,2060 v1(3385,2060)
OUT5_P: C44.2 R168.2 R184.2 R202.2 R218.2 U28.6 | length 3264.6
  Top Layer w10: R168.2@4014.76,1462.7 3967.3,1462.7 3920,1510 3920,1725 3955,1760 4012.53,1760 R184.2@4014.76,1757.77 4014.76,1899.76 4190,2075 v1(4315,2075) ; C44.2@4435,3295 4435,2715 4311.62,2591.62 U28.6@4311.62,2186.09 4313.31,2184.4 4313.31,2076.69 v1(4315,2075) ; R202.2@4634.76,1452.77 4702.77,1452.77 4725,1475 4725,1720 4695,1750 4637.45,1750 R218.2@4634.76,1752.7 4634.76,1985.24 4545,2075 v1(4315,2075)
OUT6_P: C48.2 R166.2 R182.2 R199.2 R216.2 U27.6 | length 3463.5
  Top Layer w10: C48.2@4770,3295 4770,3090 5276.48,2583.52 U27.6@5276.48,2186.09 5275.74,2185.34 5275.74,2075.74 v1(5275,2075) ; R166.2@4960.07,1452.77 4902.23,1452.77 4855,1500 4855,1700 4897.77,1742.77 R182.2@4960.07,1742.77 4960.07,1895.07 5140,2075 v1(5275,2075) ; R199.2@5575.07,1447.77 5637.77,1447.77 5670,1480 5670,1720 5650,1740 5577.84,1740 R216.2@5575.07,1742.77 5575.07,2004.93 5505,2075 v1(5275,2075)
OUT7_P: C59.2 R170.2 R186.2 R204.2 R220.2 U29.6 | length 4165.4
  Top Layer w10: C59.2@5105,3305 5105,2895 5395,2605 6105,2605 6212.82,2497.18 U29.6@6212.82,2165.62 6211.41,2164.21 6211.41,2041.41 v1(6210,2040) ; R170.2@5903.53,1447.62 5832.38,1447.62 5830.02,1449.98 5805,1475 5805,1715 5835,1745 5901.07,1745 R186.2@5903.53,1742.54 5903.53,1938.53 6005,2040 v1(6210,2040) ; R204.2@6518.53,1447.62 6557.62,1447.62 6625,1515 6625,1695 6585,1735 6521.07,1735 R220.2@6518.53,1737.54 6518.53,1986.47 6465,2040 v1(6210,2040)
OUT8_P: C70.2 R172.2 R188.2 R206.2 R222.2 U30.6 | length 4625.2
  Top Layer w10: C70.2@5440,3305.2 5440,2995 5675,2760 6868.3,2760 7150.61,2477.69 U30.6@7150.61,2165.62 7150.31,2165.32 v1(7150.31,2060.31) ; R172.2@6840.6,1442.54 6772.46,1442.54 6760,1455 6760,1730 6775,1745 6838.14,1745 R188.2@6840.6,1742.54 6840.6,1875.6 7025,2060 7150,2060 v1(7150.31,2060.31) ; R206.2@7455.6,1442.46 7512.46,1442.46 7545,1475 7545,1705 7510,1740 7458.14,1740 R222.2@7455.6,1742.54 7455.6,1964.4 7359.69,2060.31 v1(7150.31,2060.31)
PHY_RST_N: C55.2 D4.1 R72.1 R79.2 U12.24 | length 3433.6
  Top Layer w6: R79.2@5130,5815 5135,5810 v1(5210,5810) ; v1(5480,7225) 6135,7225 6663.77,7753.77 6693.85,7753.77 R72.1@6695,7754.92 6759.92,7754.92 6770,7765 6754.21,7780.79 U12.24@6754.21,7909.9 ; D4.1@6770,7768.39 6883.39,7768.39 C55.2@6885,7770
  Bottom Layer w6: v1(5210,5810) 5285,5810 5480,6005 v1(5480,7225)
PULSE_24V_GND: D1.2 P1.1 U2.3 | length 461.3
  Top Layer w6: U2.3@7203.07,5905 7259.21,5905 7347.15,5817.06 D1.2@7350,5817.06 7357.06,5810 P1.1@7625,5810
PULSE_EXT_24V+: P1.3 R2.1 | length 303.1
  Top Layer w6: R2.1@7355,6289.84 7545.16,6289.84 P1.3@7625,6210
PULSE_OUT: D1.1 P1.2 R4.2 U2.4 | length 520.7
  Top Layer w6: U2.4@7203.07,6005 7347.94,6005 7355,6012.06 R4.2@7355,6100 ; D1.1@7350,6002.94 7357.06,6010 P1.2@7625,6010
R1: BOOT1.6 CON4.7 | length 3222.1
  Top Layer w6: BOOT1.6@4010,8970 4272.09,8707.91 4272.09,8062.09 v1(4270,8060) ; CON4.7@4849.6,6429.16 5069.49,6429.16 5070.97,6427.68 5077.32,6427.68 v1(5080,6425)
  Bottom Layer w6: v1(4270,8060) 5080,7250 v1(5080,6425)
R14: CON2.22 R114.2 | length 567.5
  Top Layer w6: CON2.22@3859.84,6566.96 3906.96,6566.96 3936,6596 3936,6860.14 3935.99,6899.78 3875,6960.78 R114.2@3875,7050.08
RMII_CRS_DV: CON2.32 R94.2 | length 3998.2
  Top Layer w6: CON2.32@3859.84,6665.46 3779.54,6665.46 3720,6725 3720,7235 3905,7420 5670,7420 5672.5,7422.5 5674.62,7424.62 ccw(c5665.43,7433.81) 5674.62,7443.01 5612.51,7505.12 cw(c5621.7,7514.31) 5612.51,7523.5 cw(c5621.7,7514.31) 5630.9,7523.5 5724.52,7429.88 ccw(c5733.71,7439.07) 5742.91,7429.88 ccw(c5733.71,7439.07) 5742.91,7448.26 5649.28,7541.89 cw(c5658.47,7551.08) 5649.28,7560.27 cw(c5658.47,7551.08) 5667.67,7560.27 5729.78,7498.16 ccw(c5738.97,7507.35) 5748.16,7498.16 5772.5,7522.5 6170,7920 R94.2@6260.16,7920
RMII_REFCLK: CON2.30 R93.2 | length 4096.9
  Top Layer w6: CON2.30@3859.84,6645.76 3901.35,6645.76 3910,6654.41 3910,6850 3760,7000 3760,7220 3930,7390 5720,7390 5782.5,7452.5 5784.62,7454.62 ccw(c5775.43,7463.81) 5784.62,7473.01 5771.81,7485.82 cw(c5781,7495.01) 5771.81,7504.21 cw(c5781,7495.01) 5790.19,7504.21 5820.48,7473.92 ccw(c5829.67,7483.11) 5838.86,7473.92 ccw(c5829.67,7483.11) 5838.86,7492.3 5808.58,7522.59 cw(c5817.77,7531.78) 5808.58,7540.97 cw(c5817.77,7531.78) 5826.96,7540.97 5857.25,7510.69 ccw(c5866.44,7519.88) 5875.63,7510.69 ccw(c5866.44,7519.88) 5875.63,7529.07 5845.35,7559.36 cw(c5854.54,7568.55) 5845.35,7577.74 cw(c5854.54,7568.55) 5863.73,7577.74 5894.02,7547.46 ccw(c5903.21,7556.65) 5912.4,7547.46 ccw(c5903.21,7556.65) 5912.4,7565.84 5882.12,7596.13 cw(c5891.31,7605.32) 5882.12,7614.51 cw(c5891.31,7605.32) 5900.5,7614.51 5930.79,7584.23 ccw(c5939.98,7593.42) 5949.17,7584.23 ccw(c5939.98,7593.42) 5949.17,7602.61 5918.89,7632.9 cw(c5928.08,7642.09) 5918.89,7651.28 cw(c5928.08,7642.09) 5937.27,7651.28 5950.08,7638.47 ccw(c5959.28,7647.66) 5968.47,7638.47 5981.54,7651.54 6185,7855 R93.2@6385.08,7855
RMII_RXD0: CON2.26 R98.2 | length 3904.1
  Top Layer w6: CON2.26@3859.84,6606.36 3808.64,6606.36 3700,6715 3700,7245 3905,7450 5360,7450 5411.11,7501.11 5431.61,7521.61 cw(c5440.8,7512.42) 5450,7521.61 5456.83,7514.78 ccw(c5466.02,7523.97) 5475.22,7514.78 ccw(c5466.02,7523.97) 5475.22,7533.16 5453.03,7555.34 cw(c5462.23,7564.54) 5453.03,7573.73 cw(c5462.23,7564.54) 5471.42,7573.73 5493.6,7551.55 ccw(c5502.79,7560.74) 5511.99,7551.55 ccw(c5502.79,7560.74) 5511.99,7569.93 5505.15,7576.77 cw(c5514.34,7585.96) 5505.15,7595.15 5538.97,7628.97 6200,8290 R98.2@6295,8290
RMII_RXD1: CON2.24 R97.1 | length 3935.5
  Top Layer w6: CON2.24@3859.84,6586.66 3798.34,6586.66 3680,6705 3680,7255 3910,7485 5335,7485 6180,8330 6345,8330 6360,8315 R97.1@6360,8289.84
RMII_RXER: CON2.28 R90.2 | length 3942.5
  Top Layer w6: CON2.28@3859.84,6626.06 3911.06,6626.06 3922,6637 3922,6878 3795,7005 3795,7205 3950,7360 5785,7360 5797.5,7372.5 5799.62,7374.62 ccw(c5790.43,7383.81) 5799.62,7393.01 5788.91,7403.71 cw(c5798.11,7412.91) 5788.91,7422.1 cw(c5798.11,7412.91) 5807.3,7422.1 5841.82,7387.58 ccw(c5851.01,7396.77) 5860.2,7387.58 ccw(c5851.01,7396.77) 5860.2,7405.97 5832.54,7433.63 cw(c5841.73,7442.82) 5832.54,7452.01 cw(c5841.73,7442.82) 5850.93,7452.01 5878.58,7424.35 ccw(c5887.78,7433.54) 5896.97,7424.35 ccw(c5887.78,7433.54) 5896.97,7442.74 5869.31,7470.39 cw(c5878.5,7479.59) 5869.31,7488.78 cw(c5878.5,7479.59) 5887.7,7488.78 5915.35,7461.12 ccw(c5924.55,7470.31) 5933.74,7461.12 ccw(c5924.55,7470.31) 5933.74,7479.51 5906.08,7507.16 cw(c5915.28,7516.35) 5906.08,7525.55 cw(c5915.28,7516.35) 5924.47,7525.55 5952.12,7497.89 ccw(c5961.32,7507.08) 5970.51,7497.89 ccw(c5961.32,7507.08) 5970.51,7516.28 5942.86,7543.93 cw(c5952.05,7553.12) 5942.86,7562.31 cw(c5952.05,7553.12) 5961.24,7562.31 5988.89,7534.66 ccw(c5998.09,7543.85) 6007.28,7534.66 ccw(c5998.09,7543.85) 6007.28,7553.05 6001.85,7558.47 cw(c6011.05,7567.66) 6001.85,7576.85 6026.37,7601.37 6215,7790 R90.2@6260.08,7790
RMII_TXD0: R111.1 U12.20 | length 3184.6
  Top Layer w6: R111.1@3940,7109.92 3940,7235 4000,7295 6136.57,7295 6675.47,7833.9 U12.20@6675.47,7909.9
RMII_TXD1: R109.1 U12.21 | length 3144.5
  Top Layer w6: R109.1@4005,7109.84 4005,7230 4035,7260 6135,7260 6695.16,7820.16 U12.21@6695.16,7909.9
RMII_TXEN: R114.1 U12.19 | length 3217.1
  Top Layer w6: R114.1@3875,7109.92 3875,7230 3975,7330 6135,7330 6655,7850 6655,7909.11 U12.19@6655.79,7909.9
RXCAN: U9.2 U11.1 | length 155.4
  Top Layer w6: U9.2@6195,5155 6225.32,5155 6250.32,5180 U11.1@6340,5180
RXCAN_1: U6.4 U11.2 | length 491.8
  Top Layer w6: U11.2@6440,5180 6565,5055 U6.4@6880,5055
SYS_RESET_INPUT: C9.2 CON3.41 R10.2 R15.2 Z2.2 | length 4281.3
  Top Layer w6: CON3.41@4009.44,5867.8 4122.8,5867.8 v1(4125,5870) ; v1(4060,7885) 4575,7885 5120,8430 C9.2@5120,8490 5125.12,8484.88 Z2.2@5205,8484.88 5285.58,8484.88 R15.2@5285.77,8485.08 R10.2@5370,8485.08
  Bottom Layer w6: v1(4060,7885) 4060,7725 4500,7285 4500,6073.13 4421,5994.13 4421,5914.06 4421,5881 4355,5815 4176.87,5815 4125,5866.87 v1(4125,5870)
T1: BOOT1.9 CON4.13 | length 3151.3
  Top Layer w6: BOOT1.9@3710,8970 3710,8895 3860,8745 3860,8265 v1(4130,7995) ; CON4.13@4849.6,6488.26 4850.47,6489.13 4989.13,6489.13 v1(4990,6490)
  Bottom Layer w6: v1(4130,7995) 4990,7135 v1(4990,6490)
T2: BOOT1.8 CON4.11 | length 3179.3
  Top Layer w6: BOOT1.8@3810,8970 4155,8625 4155,8038.79 4165,8028.79 v1(4165,8025) ; CON4.11@4849.6,6468.56 4850.32,6469.28 5024.28,6469.28 v1(5025,6470)
  Bottom Layer w6: v1(4165,8025) 5025,7165 v1(5025,6470)
T3: BOOT1.7 CON4.9 | length 3193.1
  Top Layer w6: BOOT1.7@3910,8970 4220,8660 v1(4220,8030) ; CON4.9@4849.6,6448.86 4850.17,6449.43 5049.43,6449.43 v1(5050,6450)
  Bottom Layer w6: v1(4220,8030) 5050,7200 v1(5050,6450)
T15: CON4.40 R124.2 | length 903.6
  Top Layer w6: CON4.40@4700,6744.16 4645.84,6744.16 4620,6770 4620,6840 4683.81,6903.81 5191.19,6903.81 5255,6840 R124.2@5255,6784.92
T17: CON3.39 R79.1 | length 1115.8
  Top Layer w6: CON3.39@4009.44,5848.1 4011.12,5846.42 4053.89,5846.42 4055.31,5845 v1(4080,5845) ; v1(5000,5820) 5005,5815 R79.1@5070.16,5815
  Bottom Layer w6: v1(4080,5845) 4155,5770 4537.11,5770 4587.11,5820 v1(5000,5820)
T18: CON3.43 R83.1 | length 1137.8
  Top Layer w6: CON3.43@4009.44,5887.5 4010.69,5888.75 4073.75,5888.75 v1(4075,5890) ; v1(5000,5880) R83.1@5070,5880
  Bottom Layer w6: v1(4075,5890) 4172,5793 4523,5793 4610,5880 v1(5000,5880)
TXCAN: U9.1 U11.3 | length 155.4
  Top Layer w6: U9.1@6195,5105 6225.32,5105 6250.32,5080 U11.3@6340,5080
TXCAN_1: U6.1 U11.4 | length 856.6
  Top Layer w6: U11.4@6440,5080 6530,4990 6925,4990 6990,5055 6990,5175 6960,5205 U6.1@6880,5205
U3: BOOT1.10 CON4.15 | length 3161.4
  Top Layer w6: BOOT1.10@3610,8970 3610,8760 3660,8710 3660,8345 4025,7980 v1(4090,7980) ; CON4.15@4849.6,6507.96 4850.62,6508.98 4953.98,6508.98 v1(4955,6510)
  Bottom Layer w6: v1(4090,7980) 4955,7115 v1(4955,6510)
U16: CON4.38 R122.2 | length 1108.9
  Top Layer w6: CON4.38@4700,6724.46 4635.54,6724.46 4585,6775 4585,6880 4645,6940 5240,6940 5320,6860 R122.2@5320,6785
U17: CON4.34 R117.2 | length 1497.7
  Top Layer w6: CON4.34@4700,6685.06 4594.94,6685.06 4515,6765 4515,6950 4565,7000 5320,7000 5450,6870 R117.2@5450,6784.92
U18: CON2.18 R109.2 | length 631
  Top Layer w6: CON2.18@3859.84,6527.66 3942.66,6527.66 3960,6545 3960,6870.08 3959.99,6919.99 4005,6965 R109.2@4005,7050
UART0_RXD_1: U4.1 U7.2 | length 240
  Top Layer w6: U7.2@6495,6930 U4.1@6735,6930
UART0_TXD_1: R129.2 U4.4 U7.4 | length 367.7
  Top Layer w6: R129.2@6490.16,6725 6495,6729.84 U7.4@6495,6830 6545,6780 U4.4@6735,6780
UART1_RXD: R105.2 U13.3 | length 2655.4
  Top Layer w6: R105.2@3985,7654.92 3985,7730 4105,7850 4625,7850 4925,8150 5260,8150 U13.3@6060,8950
UART1_TXD: R106.2 U13.2 | length 2713.9
  Top Layer w6: R106.2@4050,7654.92 4050,7715 4135,7800 4650,7800 4940,8090 5280,8090 5965,8775 6040,8775 6160,8895 U13.2@6160,8950
V16: CON2.20 R111.2 | length 582.1
  Top Layer w6: CON2.20@3859.84,6547.26 3859.9,6547.32 3927.32,6547.32 3948,6568 3948,6865.11 3947.99,6924.96 3948,6968.97 3940,6976.97 R111.2@3940,7050.08
VBIAS_1V5: R149.1 R151.1 R154.1 R156.1 R159.1 R161.1 R162.1 R164.1 R258.1 R263.1 R265.1 R266.1 R267.1 R268.1 R269.1 R270.1 R282.1 R283.1 R284.1 R285.1 R286.1 R287.1 R288.1 R289.1 R290.2 R291.2 R292.2 R293.1 R294.2 R295.2 R296.2 R297.2 U44.1 U44.4 | length 4037.6
  Top Layer w10: R265.1@6330,1849.92 R265.1@6330.04,1849.96
  Top Layer w15: U44.1@4004.58,3767.4 4006.73,3765.25 4039.75,3765.25 4095,3710 U44.4@4095,3695 ; U44.4@4095.42,3692.6 4152.4,3692.6 v1(4155,3690)
  Top Layer w20: R297.2@1104.92,1405 1104.92,1454.92 v1(1105,1455) ; R294.2@2045,1405 v1(2045,1450) ; v1(2250,3305) R282.1@2250,3360 ; R283.1@2585,3365 2585,3310 v1@2590,3305 ; R284.1@2919.84,3370.08 2919.84,3310.16 v1@2920,3310 ; R295.2@2949.92,1375 2950,1375.08 v1(2950,1425) ; v1@3255,3315 R285.1@3255,3375 ; R296.2@3870,1380 v1(3870,1435) ; v1@4200,3320 R286.1@4200,3370 ; v1@4535,3310 R287.1@4535,3370 ; R291.2@4824.92,1365 4825,1365.08 v1(4825,1420) ; v1(4870,3315) R288.1@4870,3375 ; v1(5205,3310) R289.1@5205,3375.08 ; R290.2@5764.92,1370 5765,1370.08 v1(5765,1420) ; R292.2@6695,1395 v1(6695,1450) ; R293.1@7634.92,1320 7634.92,1379.92 v1(7635,1380)
  Top Layer w30: R151.1@475,1110 475,1150 610,1285 v1(625,1285) ; v1(685,1870) R270.1@735,1870 ; R164.1@1375.71,1110 1376.42,1110 1536.42,1270 v1(1575,1270) ; v1(1655,1855) 1655.08,1854.92 R267.1@1705,1854.92 ; R159.1@2276.43,1110 2277.14,1110 2277.18,1110.04 2277.18,1128.09 2399.09,1250 v1(2475,1250) ; v1(2560,1860) 2560.42,1860.42 2603.45,1860.42 R268.1@2603.49,1860.46 ; R162.1@3177.14,1110 3177.85,1110 3312.85,1245 v1(3405,1245) ; v1(3450,1865) 3450.08,1864.92 R269.1@3500,1864.92 ; R149.1@4077.86,1110 4078.57,1110 4233.57,1265 v1(4325,1265) ; v1(4390,1865) 4391.85,1863.15 R263.1@4441.87,1863.15 ; R154.1@4978.57,1110 4979.28,1110 4979.32,1110.04 4979.32,1129.32 5070,1220 v1(5275,1220) ; v1(5340,1875) 5341.85,1873.15 R258.1@5396.42,1873.15 ; R156.1@5880.03,1110.04 5880.03,1110.75 5969.29,1200 6210,1200 v1(6250,1240) ; v1(6275,1850) v1(6275,1850) R265.1@6330.04,1849.96 ; R161.1@6840.6,1110 6900.6,1170 7105,1170 v1(7195,1260) ; v1(7242,1860) 7244.03,1857.97 7269.97,1857.97 R266.1@7270.01,1857.93
  other v1: 2590,3300 2915,3310 3250,3315 4530,3315 4195,3320
VBIAS_1V5_RAW: C197.2 C198.2 U43.1 U44.3 | length 302.7
  Top Layer w20: U43.1@3708.31,3692.6 3709.65,3691.26 3778.74,3691.26 C198.2@3780,3690 ; C198.2@3780,3689.92 C197.2@3844.92,3689.92 ; C197.2@3845,3689.92 3919.92,3689.92 3920,3690 U44.3@4010,3690
W15: CON4.36 R119.2 | length 1307.5
  Top Layer w6: CON4.36@4700,6704.76 4615.24,6704.76 4550,6770 4550,6915 4610,6975 5275,6975 5385,6865 R119.2@5385,6784.92
XI: C76.2 U12.8 Y1.3 | length 379
  Top Layer w6: C76.2@6645,8375 6644.21,8374.21 6644.21,8230.79 6670,8205 Y1.3@6715,8205 6715,8135.79 6734.53,8116.26 U12.8@6734.53,8060.1
XO: C77.2 U12.7 Y1.1 | length 481.9
  Top Layer w6: U12.7@6754.21,8060.1 6754.21,8090 6779.21,8115 6825,8115 6900,8190 6900,8255 6865,8290 Y1.1@6815,8290 ; Y1.1@6815,8291.61 6815,8336.15 6853.85,8375 C77.2@6854.64,8375
pads on no net: "CON1. " "CON2. " "CON3. " "CON4. " CON1.1 CON1.2 CON1.3 CON1.4 CON1.5 CON1.6 CON1.7 CON1.8 CON1.9 CON1.10 CON1.11 CON1.12 CON1.13 CON1.14 CON1.15 CON1.16 CON1.17 CON1.18 CON1.19 CON1.20 CON1.21 CON1.22 CON1.23 CON1.24 CON1.25 CON1.26 CON1.27 CON1.28 CON1.29 CON1.30 CON1.31 CON1.32 CON1.33 CON1.34 CON1.35 CON1.36 CON1.38 CON1.39 CON1.40 CON1.41 CON1.42 CON1.44 CON1.45 CON1.46 CON1.47 CON1.48 CON1.49 CON2.2 CON2.4 CON2.6 CON2.8 CON2.10 CON2.12 CON2.14 CON2.16 CON2.33 CON2.34 CON2.36 CON2.37 CON2.38 CON2.40 CON2.41 CON2.42 CON2.43 CON2.44 CON2.46 CON2.47 CON2.49 CON3.1 CON3.2 CON3.3 CON3.4 CON3.5 CON3.6 CON3.7 CON3.8 CON3.9 CON3.11 CON3.12 CON3.14 CON3.16 CON3.18 CON3.24 CON3.26 CON3.28 CON3.37 CON3.45 CON4.1 CON4.2 CON4.3 CON4.4 CON4.5 CON4.6 CON4.8 CON4.10 CON4.12 CON4.14 CON4.17 CON4.19 CON4.21 CON4.23 CON4.25 CON4.27 CON4.29 CON4.31 CON4.33 CON4.35 CON4.37 CON4.39 CON4.41 CON4.42 CON4.44 CON4.45 CON4.46 CON4.47 CON4.48 D5.5 H1.10 RJ1.7 RJ1.11 RJ1.12 SW3.1 SW3.4 SW3.5 U1.9 U1.10 U1.11 U1.12 U1.13 U1.14 U1.15 U3.8 U3.23 U3.24 U3.25 U3.26 U3.27 U3.30 U9.3 U9.4 U9.5 U9.6 U9.10 U9.11 U10.8 U10.23 U10.24 U10.25 U10.26 U10.27 U10.30 U14.4 U25.3 U25.5 U26.1 U27.1 U27.5 U27.8 U28.1 U28.5 U28.8 U29.1 U29.5 U29.8 U30.1 U30.5 U30.8 U31.1 U31.5 U31.8 U32.1 U32.5 U32.8 U33.1 U33.5 U33.8 U34.1 U34.5 U34.8 U35.12 U36.12 U37.12 U38.12 U39.12 U40.12 U41.12 U42.12 USB1.1 USB1.4

## Polygon pours and split planes (outlines as drawn)
GND on Bottom Layer "GND_L04_P001" (solid, remove dead copper, pour order 1): -5,9050 7875,9050 7875,0 7870,-5 0,-5
GND on Top Layer "GND_L01_P000" (solid, remove dead copper, pour order 0): 5,9045 10,9040 7875,9040 7875,-5 7870,0 5,0